# Altium PCB PCB1.PcbDoc
Units mil, origin at the board's own origin, x right, y up, seen from the top; angles counter-clockwise.
Board outline 4094.49 x 2755.91 mil, 4 copper layers (Top Layer, VCC, GND, Bottom Layer), stack 41 mil thick; 96 components, 180 nets, 688 pads, 0 vias.
Unrouted connection lines stored in the file: 475.
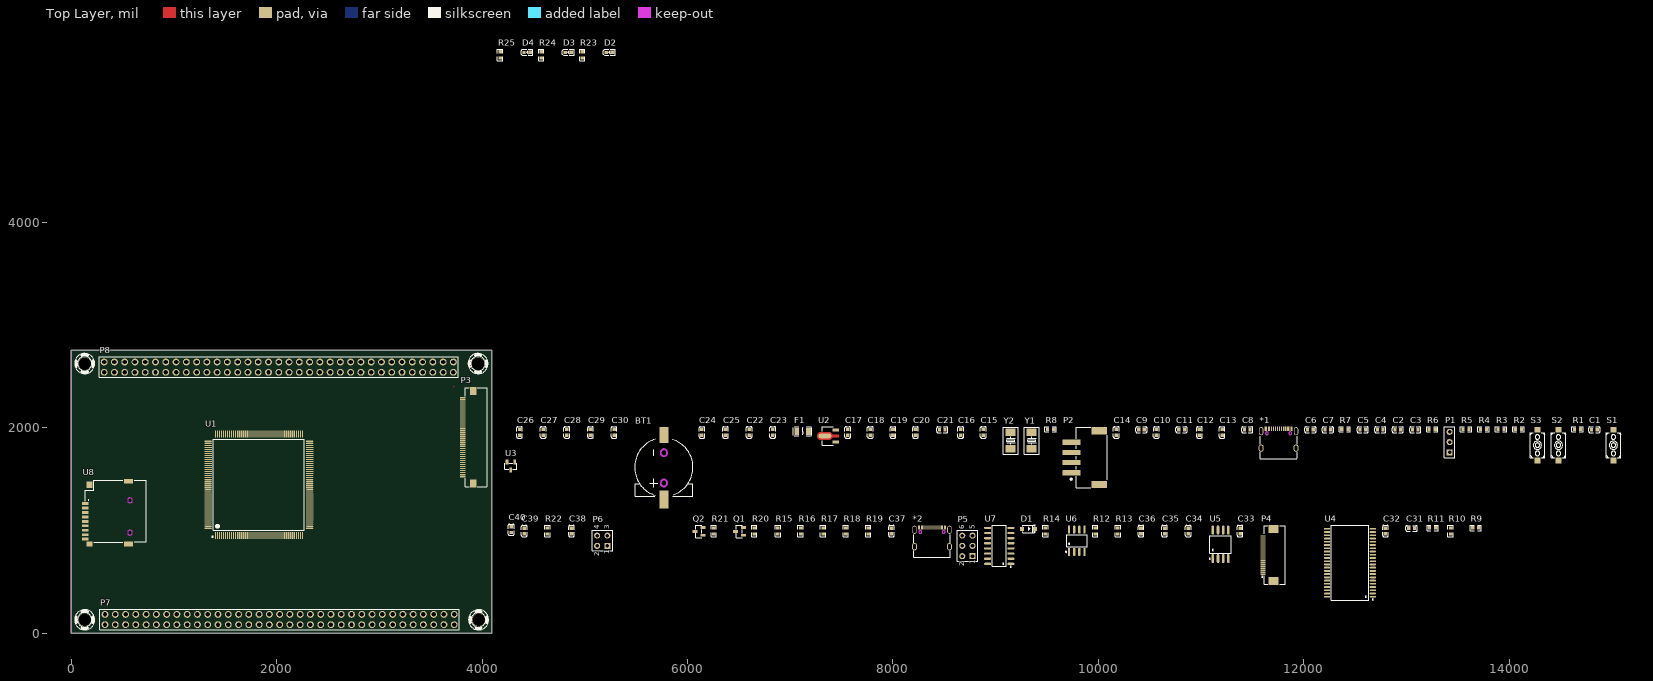
[diagram p0: Top Layer view]
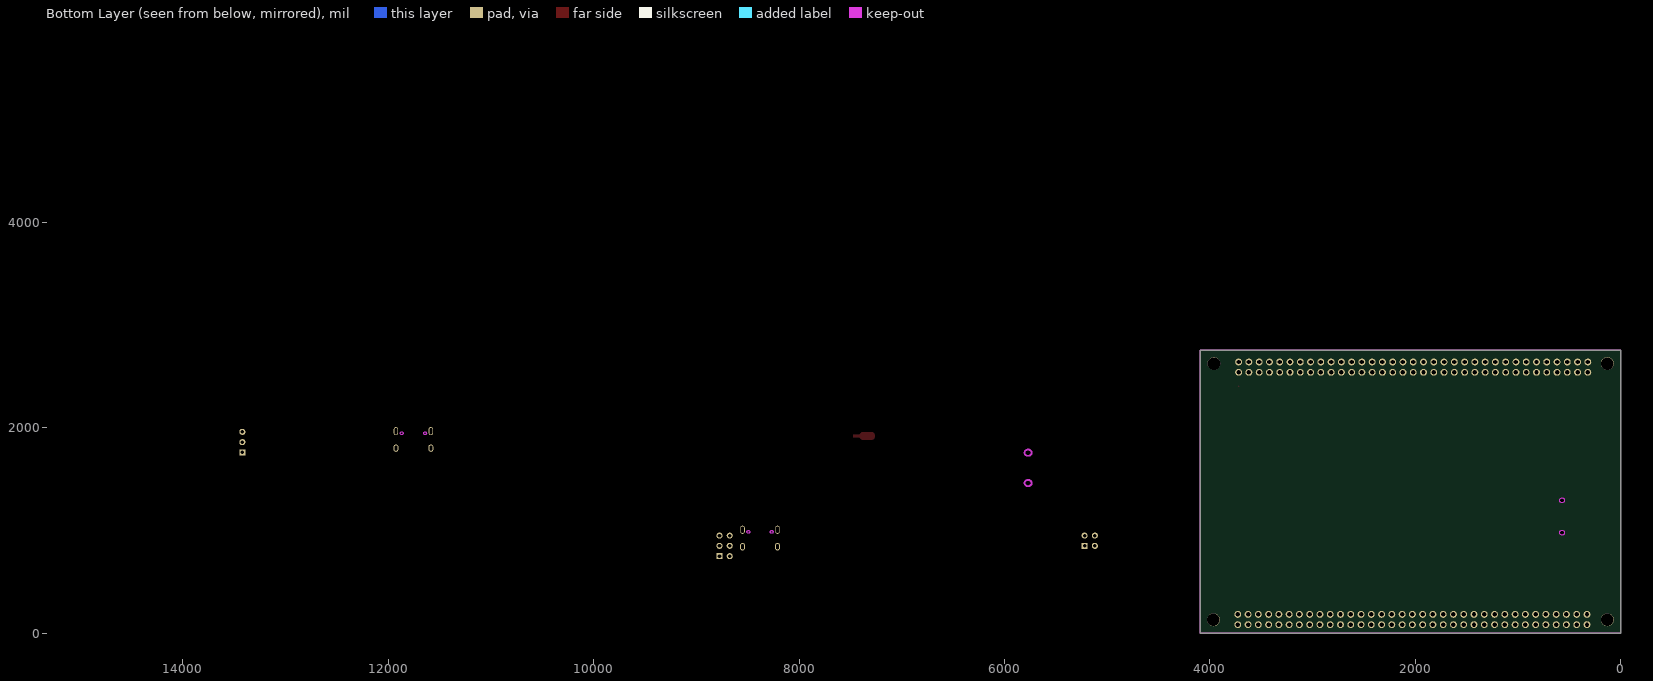
[diagram p1: Bottom Layer view, seen from below]
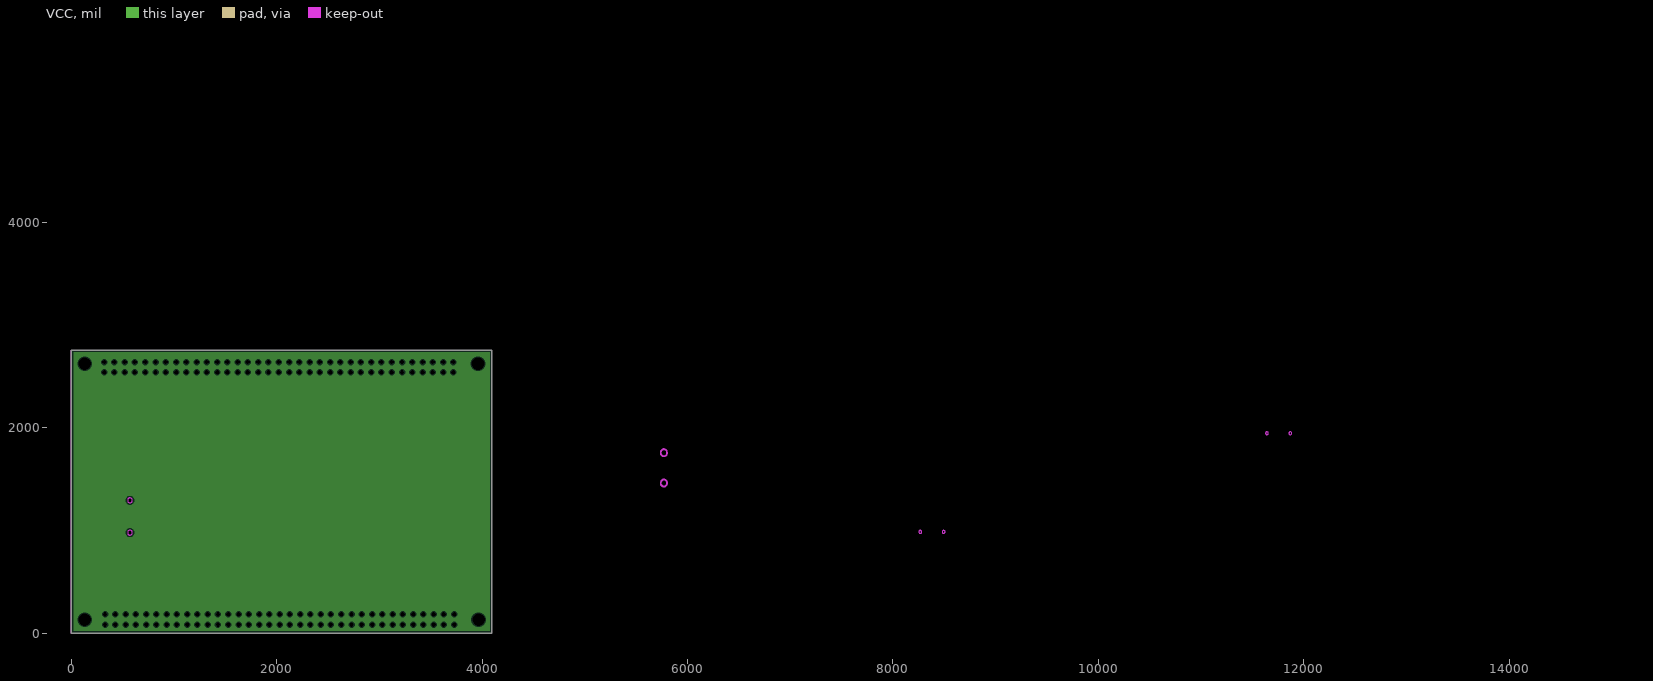
[diagram p2: VCC, clearances drawn from the general rule]
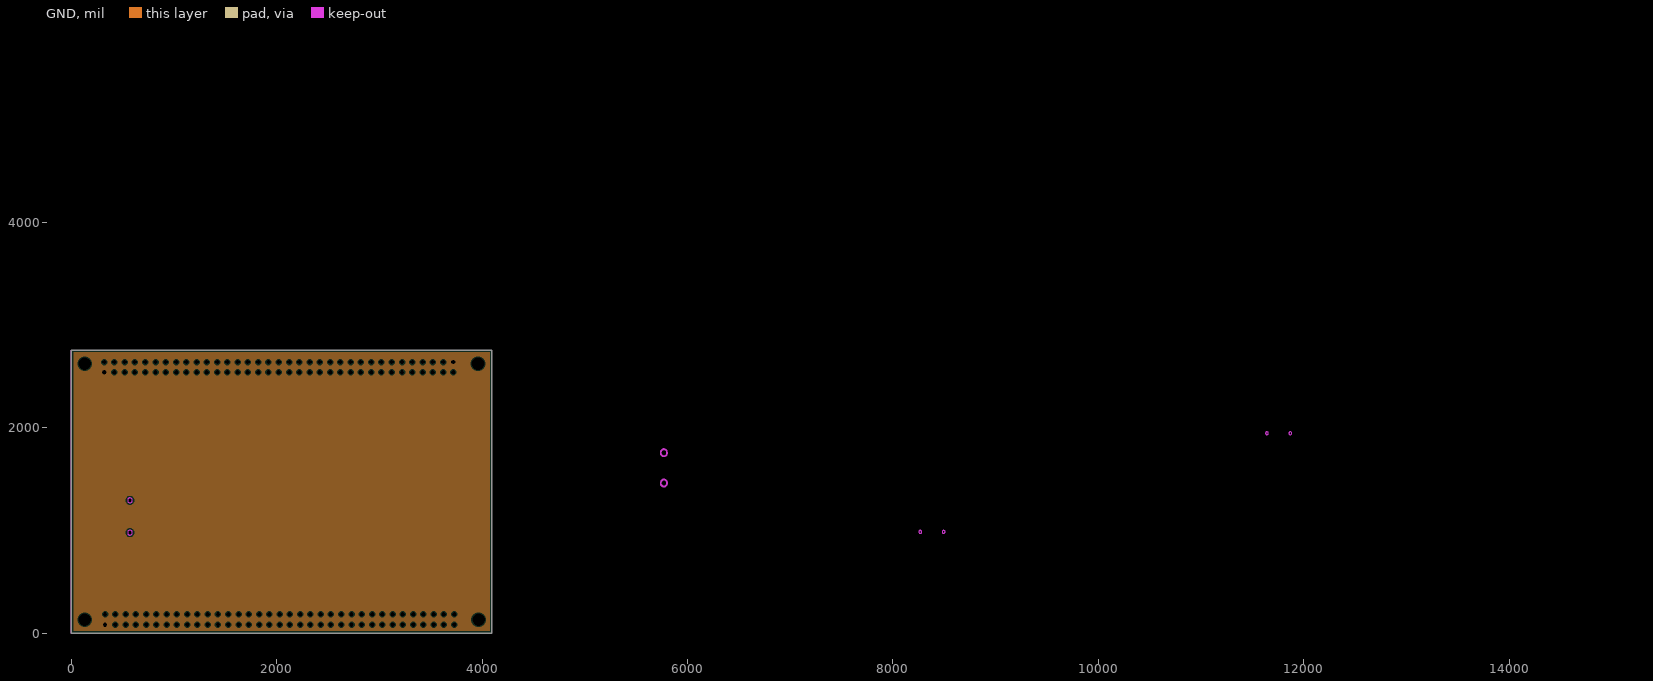
[diagram p3: GND, clearances drawn from the general rule]

## Layer stack, top to bottom
Top Solder: solder mask 0.4, Solder Resist, Dk 3.5
Top Layer: signal copper 1.4
Dielectric 2: prepreg 2.8, PP-006, Dk 4.1
VCC: plane copper 10, net VCC
Dielectric 1: dielectric 12.6, FR-4, Dk 4.8
GND: plane copper 10, net GND
Dielectric 3: prepreg 2.8, PP-006, Dk 4.1
Bottom Layer: signal copper 1.4
Bottom Solder: solder mask 0.4, Solder Resist, Dk 3.5

## Board outline
0,0 0,2755.91 4094.49,2755.91 4094.49,0

## Design rules (kind name [scope] priority, off if disabled: settings)
Clearance [All] p1: gap=10 ignorepadtopadclearanceinfootprint=TRUE except(5: Arc-Arc Arc-Track Arc-SMDPad Arc-THPad Arc-Via Arc-Text Track-Track Track-SMDPad Track-THPad Track-Via Track-Text SMDPad-SMDPad SMDPad-THPad SMDPad-Via SMDPad-Text THPad-THPad THPad-Via THPad-Text Via-Via Via-Text Fill-Text Poly-Text Region-Text Text-Text)
DiffPairsRouting [All] p1: maxlimit=10 minlimit=8 mostfreqgap=10 toplayer_minwidth=6.12 toplayer_maxwidth=15 toplayer_prefwidth=6.12 bottomlayer_minwidth=6.12 bottomlayer_maxwidth=15 bottomlayer_prefwidth=6.12 maxuncoupledlength=500
PlaneClearance [All] p1: clearance=10
PlaneConnect [All] p1: planeconnectstyle=Relief reliefexpansion=20 reliefentries=4 reliefconductorwidth=10 reliefairgap=10
PolygonConnect [All] p1: thpad.connectstyle=Relief thpad.reliefconductorwidth=10 thpad.reliefentries=4 thpad.polygonreliefangle="90 Angle" thpad.airgapwidth=10 smdpad.connectstyle=Relief smdpad.reliefconductorwidth=10 smdpad.reliefentries=4 smdpad.polygonreliefangle="45 Angle" smdpad.airgapwidth=10 via.connectstyle=Relief via.reliefconductorwidth=10 via.reliefentries=4 via.polygonreliefangle="90 Angle" via.airgapwidth=10
RoomDefinition Sheet3 [InComponentClass('Sheet3')] p1: confinementstyle=ConfineIn formatcopy=TRUE lockcomponents=FALSE outline 4140,2175 5825,2175 5825,5795 4140,5795
RoomDefinition Sheet2 [InComponentClass('Sheet2')] p2: confinementstyle=ConfineIn formatcopy=TRUE lockcomponents=FALSE outline 4140,1205 15100,1205 15100,2120 4140,2120
RoomDefinition Sheet1 [InComponentClass('Sheet1')] p3: confinementstyle=ConfineIn formatcopy=TRUE lockcomponents=FALSE outline 4140,60 13745,60 13745,1160 4140,1160
RoutingVias power_via [All] p1: holewidth=15 width=17 viastyle="Through Hole" minholewidth=28 minwidth=50 maxholewidth=28 maxwidth=50
RoutingVias general_via [All] p2: holewidth=12 width=16 viastyle="Through Hole" minholewidth=28 minwidth=50 maxholewidth=28 maxwidth=50
SolderMaskExpansion [All] p1: expansion=4 istentingtop=FALSE
Width POW [All] p1: maxlimit=10 minlimit=10 preferedwidth=10
Width SRAM_DAT [All] p2: maxlimit=5.5 minlimit=5.5 preferedwidth=5.5 minimp=50.000000 maximp=50.000000 favimp=50.000000
Width SRAM_ADD [All] p3: maxlimit=5.5 minlimit=5.5 preferedwidth=5.5 minimp=50.000000 maximp=50.000000 favimp=50.000000
27 further rules are at their usual default settings.

## Classes and differential pairs
component class Sheet3: D2 D3 D4 P7 P8 R23 R24 R25
component class Sheet2: *1 BT1 C1 C2 C3 C4 C5 C6 C7 C8 C9 C10 C11 C12 C13 C14 C15 C16 C17 C18 C19 C20 C21 C22 C23 C24 C25 C26 C27 C28 C29 C30 F1 P1 P2 R1 R2 R3 R4 R5 R6 R7 R8 S1 S2 S3 U1 U2 U3 Y1 Y2
component class Sheet1: *2 C31 C32 C33 C34 C35 C36 C37 C38 C39 C40 D1 P3 P4 P5 P6 Q1 Q2 R9 R10 R11 R12 R13 R14 R15 R16 R17 R18 R19 R20 R21 R22 U4 U5 U6 U7 U8
differential pair USB340: +USB340_P -USB340_N
differential pair USB1OTG: +USB1OTG_P -USB1OTG_N

## Components (designator, comment, footprint, x,y, rotation, side; value= is the part's Value field where it differs from the comment)
*1 "TYPE-C" USB-C-SMD_TYPE-C-6PIN-2MD-073 11755,1895 r0 top
*2 "TYPE-C" USB-C-SMD_TYPE-C-6PIN-2MD-073 8380,935 r0 top
BT1 "Battery" BAT-SMD_CR1220-2 5770,1615 r90 top
C1 "100nF" C0603 14830,1980 r0 top value=100pF
C2 "100nF" C0603 12915,1980 r0 top value=100pF
C3 "10uF" C0603 13085,1980 r0 top value=100pF
C4 "2.2uF" C0603 12745,1980 r0 top value=100pF
C5 "2.2uF" C0603 12575,1980 r0 top value=100pF
C6 "100nF" C0603 12065,1980 r0 top value=100pF
C7 "10uF" C0603 12235,1980 r0 top value=100pF
C8 "20pF" C0603 11450,1980 r0 top value=100pF
C9 "100nF" C0603 10420,1980 r0 top value=100pF
C10 "100nF" C0603 10565,1955 r90 top value=100pF
C11 "100nF" C0603 10810,1980 r0 top value=100pF
C12 "100nF" C0603 10985,1955 r90 top value=100pF
C13 "100nF" C0603 11205,1955 r90 top value=100pF
C14 "20pF" C0603 10175,1955 r90 top value=100pF
C15 "20pF" C0603 8880,1955 r90 top value=100pF
C16 "20pF" C0603 8660,1955 r90 top value=100pF
C17 "100nF" C0603 7560,1955 r90 top value=100pF
C18 "100nF" C0603 7780,1955 r90 top value=100pF
C19 "100nF" C0603 8000,1955 r90 top value=100pF
C20 "100nF" C0603 8220,1955 r90 top value=100pF
C21 "100nF" C0603 8480,1980 r0 top value=100pF
C22 "100nF" C0603 6600,1955 r90 top value=100pF
C23 "10uF" C0603 6830,1955 r90 top value=100pF
C24 "100nF" C0603 6140,1955 r90 top value=100pF
C25 "10uF" C0603 6370,1955 r90 top value=100pF
C26 "100nF" C0603 4365,1955 r90 top value=100pF
C27 "100nF" C0603 4595,1955 r90 top value=100pF
C28 "100nF" C0603 4825,1955 r90 top value=100pF
C29 "100nF" C0603 5055,1955 r90 top value=100pF
C30 "100nF" C0603 5285,1955 r90 top value=100pF
C31 "10uF" C0603 13050,1020 r0 top value=100pF
C32 "10uF" C0603 12795,995 r90 top value=100pF
C33 "100nF" C0603 11380,995 r90 top value=100pF
C34 "100nF" C0603 10875,995 r90 top value=100pF
C35 "100nF" C0603 10645,995 r90 top value=100pF
C36 "100nF" C0603 10415,995 r90 top value=100pF
C37 "100nF" C0603 7985,995 r90 top value=100pF
C38 "100nF" C0603 4870,995 r90 top value=100pF
C39 "100nF" C0603 4410,995 r90 top value=100pF
C40 "100nF" C0603 4283.46,1007.88 r90 top value=100pF
D1 "1N4148" SOD-123_L2.7-W1.6-LS3.7-FD 9320,1015 r0 top
D2 "LED0" LED0603-RD_RED 5240,5655 r0 top
D3 "LED0" LED0603-RD_RED 4840,5655 r0 top
D4 "LED0" LED0603-RD_RED 4440,5655 r0 top
F1 "smd1206-100-30" F1206 7120,1965 r0 top
P1 "Header 3" HDR1X3 13420,1760 r90 top
P2 "Header 4" CONN-SMD_HCZZ0021-4 9875,1710 r90 top
P3 "LCD_SCREEN" FPC-SMD_P0.50-40P_FGS-XJ-H2.0 3862.2,1907.48 r270 top
P4 "OV5460" FPC-SMD_20P-P0.50_XUNPU_FPC-05F-20PH20 11655,760 r90 top
P5 "Header 3X2" HDR2X3 8775,750 r90 top
P6 "Header 2X2" HDR2X2 5220,850 r90 top
P7 "TEXT_PIN" TEST_P70 3728.35,182.68 r180 top
P8 "TEXT_PIN" TEST_P70 3720,2640 r180 top
Q1 "SS8050" SOT-23-3_L2.9-W1.3-P1.90-LS2.4-BR 6505,990 r0 top
Q2 "SS8550" SOT-23-3_L2.9-W1.3-P1.90-LS2.4-BR 6110,990 r0 top
R1 "10K" R0603 14665,1985 r0 top value=1K
R2 "0" R0603 14090,1985 r0 top value=1K
R3 "0" R0603 13920,1985 r0 top value=1K
R4 "0" R0603 13750,1985 r0 top value=1K
R5 "0" R0603 13580,1985 r0 top value=1K
R6 "10R" R0603 13250,1985 r0 top value=1K
R7 "10R" R0603 12400,1985 r0 top value=1K
R8 "10K" R0603 9535,1985 r0 top value=1K
R9 "10K" R0603 13675,1025 r0 top value=1K
R10 "2.2R" R0603 13430,995 r90 top value=1K
R11 "2.2R" R0603 13255,1025 r0 top value=1K
R12 "10K" R0603 9970,995 r90 top value=1K
R13 "10K" R0603 10190,995 r90 top value=1K
R14 "10K" R0603 9485,995 r90 top value=1K
R15 "10K" R0603 6880,995 r90 top value=1K
R16 "10K" R0603 7100,995 r90 top value=1K
R17 "10K" R0603 7320,995 r90 top value=1K
R18 "10K" R0603 7540,995 r90 top value=1K
R19 "10K" R0603 7760,995 r90 top value=1K
R20 "1K" R0603 6650,995 r90 top
R21 "1K" R0603 6255,995 r90 top
R22 "1K" R0603 4635,995 r90 top
R23 "1K" R0603 4975,5630 r90 top
R24 "1K" R0603 4575,5630 r90 top
R25 "1K" R0603 4175,5630 r90 top
S1 "SW-PB" KEY-SMD_L6.2-W3.6-LS8.0 15015,1830 r90 top
S2 "SW-PB" KEY-SMD_L6.2-W3.6-LS8.0 14480,1830 r90 top
S3 "SW-PB" KEY-SMD_L6.2-W3.6-LS8.0 14275,1830 r90 top
U1 "STM32F407IGT6" LQFP-176_L24.0-W24.0-P0.50-BL 1826.77,1444.88 r0 top
U2 "AMS1117" SOT-89-3_L4.5-W2.5-P1.50-LS4.2-BR 7390,1920 r0 top
U3 "bat54c_c22466350" SOT-23-3_L2.9-W1.3-P1.90-LS2.4-BR 4279.53,1625.98 r90 top
U4 "is61lv25616al-10tli-tr" TSOP-44_L18.4-W10.2-P0.80-LS11.8-BL 12450,685 r90 top
U5 "W25Q128" SOIC-8_L5.3-W5.3-P1.27-LS8.0-BL 11190,865 r0 top
U6 "24C20" SOP-8_L5.0-W4.0-P1.27-LS6.0-BL 9790,900 r0 top
U7 "CH340C" SOP-16_L10.0-W3.9-P1.27-LS6.0-BL 9035,850 r90 top
U8 "TF0CARD H1.8" TF-SMD_TF-PUSH 346.46,1173.23 r90 top
Y1 "10MHZ" CRYSTAL-SMD_L5.0-W3.2 9350,1875 r90 top
Y2 "32.768KHZ" CRYSTAL-SMD_L5.0-W3.2 9145,1875 r90 top

## Footprints (in the part's own frame and the unit in brackets; to place one, negate y for a bottom-side part, rotate by r counter-clockwise, add the part's x,y. Pads: shape width x height; smd on the part's side, far side on the other; paste and mask are expansions set on the pad)
BAT-SMD_CR1220-2 [mm]
  rect 4.4x2.3 smd paste+0 mask+0.05: 1(-8,0)
  rect 4x2.3 smd paste+0 mask+0.05: 2(8,0)
  Keep-Out Layer board cut-out: 4.35,0 4.247,0.371 3.972,0.642 3.6,0.741 3.227,0.642 2.953,0.371 2.85,0 2.85,0 2.953,-0.371 3.228,-0.642 3.6,-0.741 3.972,-0.642 4.247,-0.371 4.35,0
  Keep-Out Layer board cut-out: -3.15,0 -3.253,0.371 -3.527,0.642 -3.9,0.741 -4.272,0.642 -4.546,0.371 -4.65,0 -4.65,0 -4.546,-0.371 -4.272,-0.642 -3.9,-0.741 -3.527,-0.642 -3.253,-0.371 -3.15,0
  Keep-Out Layer circle w0.1: c-3.9,0 r0.926
  Keep-Out Layer circle w0.1: c3.6,0 r0.933
  Multi-Layer keep-out circle w0.254: c3.6,0 r0.75
  Multi-Layer keep-out circle w0.254: c-3.9,0 r0.75
  silkscreen extent -7.22,-7.19 6.92,7.25
C0603 [mm]
  rect 0.8x0.9 smd: 1(-0.7,0) 2(0.7,0)
  silkscreen extent -1.41,-0.71 1.39,0.72
CONN-SMD_HCZZ0021-4 [mm]
  rect 1.3x4.4 smd: 1(-3.75,3.438) 2(-1.25,3.438) 3(1.25,3.438) 4(3.75,3.438)
  rect 1.8x3.85 smd: 5(-6.65,-3.438) 6(6.65,-3.438)
  silkscreen extent -7.5,-5.35 7.5,3.75
CRYSTAL-SMD_L5.0-W3.2 [mm]
  rect 1.9x2.4 smd: 1(-2.05,0) 2(2.05,0)
  silkscreen extent -3.32,-1.85 3.33,1.85
F1206 [mm]
  rect 1.19x1.728 smd: 1(-1.445,0) 2(1.445,0)
  silkscreen extent -2.27,-1.09 2.27,1.09
FPC-SMD_20P-P0.50_XUNPU_FPC-05F-20PH20 [mm]
  rect 0.3x1.25 smd paste+0 mask+0.05: 1(-4.75,1.288) 2(-4.25,1.288) 3(-3.75,1.288) 4(-3.25,1.288) 5(-2.75,1.288) 6(-2.25,1.288) 7(-1.75,1.288) 8(-1.25,1.288) 9(-0.75,1.288) 10(-0.25,1.288) 11(0.25,1.288) 12(0.75,1.288) 13(1.25,1.288) 14(1.75,1.288) 15(2.25,1.288) 16(2.75,1.288) 17(3.25,1.288) 18(3.75,1.288) 19(4.25,1.288) 20(4.75,1.288)
  rect 2x2.5 smd paste+0 mask+0.05: 21(6.44,-1.287) 22(-6.44,-1.287)
  silkscreen extent -7.2,-4.19 7.2,1.67
FPC-SMD_P0.50-40P_FGS-XJ-H2.0 [mm]
  rect 2x1.6 smd: 0(-11.45,1.3) 0(11.45,1.3)
  rect 0.3x1.3 smd paste+0 mask+0.05: 1(9.75,-1.3) 2(9.25,-1.3) 3(8.75,-1.3) 4(8.25,-1.3) 5(7.75,-1.3) 6(7.25,-1.3) 7(6.75,-1.3) 8(6.25,-1.3) 9(5.75,-1.3) 10(5.25,-1.3) 11(4.75,-1.3) 12(4.25,-1.3) 13(3.75,-1.3) 14(3.25,-1.3) 15(2.75,-1.3) 16(2.25,-1.3) 17(1.75,-1.3) 18(1.25,-1.3) 19(0.75,-1.3) 20(0.25,-1.3) 21(-0.25,-1.3) 22(-0.75,-1.3) 23(-1.25,-1.3) 24(-1.75,-1.3) 25(-2.25,-1.3) 26(-2.75,-1.3) 27(-3.25,-1.3) 28(-3.75,-1.3) 29(-4.25,-1.3) 30(-4.75,-1.3) 31(-5.25,-1.3) 32(-5.75,-1.3) 33(-6.25,-1.3) 34(-6.75,-1.3) 35(-7.25,-1.3) 36(-7.75,-1.3) 37(-8.25,-1.3) 38(-8.75,-1.3) 39(-9.25,-1.3) 40(-9.75,-1.3)
  silkscreen extent -12.2,-0.7 12.25,4.7
HDR1X3 [mm] "Connector; Header; 3 Position"
  rect 1.5x1.5 hole 0.9: 1(0,0)
  round 1.5 hole 0.9: 2(2.54,0) 3(5.08,0)
  silkscreen extent -1.27,-1.27 6.35,1.27
HDR2X2 [mm] "Connector; Header; 2x2 Position"
  rect 1.5x1.5 hole 0.9: 1(0,0)
  round 1.5 hole 0.9: 2(0,2.54) 3(2.54,0) 4(2.54,2.54)
  silkscreen extent -1.27,-1.27 3.81,3.81
HDR2X3 [mm] "Connector; Header; 3x2 Position"
  rect 1.5x1.5 hole 0.9: 1(0,0)
  round 1.5 hole 0.9: 2(0,2.54) 3(2.54,0) 4(2.54,2.54) 5(5.08,0) 6(5.08,2.54)
  silkscreen extent -1.27,-1.27 6.35,3.81
KEY-SMD_L6.2-W3.6-LS8.0 [mm]
  rect 1.4x1.5 smd: 1(-3.8,0) 2(3.8,0)
  silkscreen extent -3.1,-1.8 3.1,1.8
LED0603-RD_RED [mm]
  rect 0.8x0.8 smd: 1(0.8,0.003) 2(-0.8,-0.003)
  silkscreen extent -1.49,-0.75 1.39,0.76
LQFP-176_L24.0-W24.0-P0.50-BL [mm]
  oval 0.28x1.8 smd: 1(-10.75,-12.55) 2(-10.25,-12.55) 3(-9.75,-12.55) 4(-9.25,-12.55) 5(-8.75,-12.55) 6(-8.25,-12.55) 7(-7.75,-12.55) 8(-7.25,-12.55) 9(-6.75,-12.55) 10(-6.25,-12.55) 11(-5.75,-12.55) 12(-5.25,-12.55) 13(-4.75,-12.55) 14(-4.25,-12.55) 15(-3.75,-12.55) 16(-3.25,-12.55) 17(-2.75,-12.55) 18(-2.25,-12.55) 19(-1.75,-12.55) 20(-1.25,-12.55) 21(-0.75,-12.55) 22(-0.25,-12.55) 23(0.25,-12.55) 24(0.75,-12.55) 25(1.25,-12.55) 26(1.75,-12.55) 27(2.25,-12.55) 28(2.75,-12.55) 29(3.25,-12.55) 30(3.75,-12.55) 31(4.25,-12.55) 32(4.75,-12.55) 33(5.25,-12.55) 34(5.75,-12.55) 35(6.25,-12.55) 36(6.75,-12.55) 37(7.25,-12.55) 38(7.75,-12.55) 39(8.25,-12.55) 40(8.75,-12.55) 41(9.25,-12.55) 42(9.75,-12.55) 43(10.25,-12.55) 44(10.75,-12.55) 89(10.75,12.55) 90(10.25,12.55) 91(9.75,12.55) 92(9.25,12.55) 93(8.75,12.55) 94(8.25,12.55) 95(7.75,12.55) 96(7.25,12.55) 97(6.75,12.55) 98(6.25,12.55) 99(5.75,12.55) 100(5.25,12.55) 101(4.75,12.55) 102(4.25,12.55) 103(3.75,12.55) 104(3.25,12.55) 105(2.75,12.55) 106(2.25,12.55) 107(1.75,12.55) 108(1.25,12.55) 109(0.75,12.55) 110(0.25,12.55) 111(-0.25,12.55) 112(-0.75,12.55) 113(-1.25,12.55) 114(-1.75,12.55) 115(-2.25,12.55) 116(-2.75,12.55) 117(-3.25,12.55) 118(-3.75,12.55) 119(-4.25,12.55) 120(-4.75,12.55) 121(-5.25,12.55) 122(-5.75,12.55) 123(-6.25,12.55) 124(-6.75,12.55) 125(-7.25,12.55) 126(-7.75,12.55) 127(-8.25,12.55) 128(-8.75,12.55) 129(-9.25,12.55) 130(-9.75,12.55) 131(-10.25,12.55) 132(-10.75,12.55)
  oval 1.8x0.28 smd: 45(12.55,-10.75) 46(12.55,-10.25) 47(12.55,-9.75) 48(12.55,-9.25) 49(12.55,-8.75) 50(12.55,-8.25) 51(12.55,-7.75) 52(12.55,-7.25) 53(12.55,-6.75) 54(12.55,-6.25) 55(12.55,-5.75) 56(12.55,-5.25) 57(12.55,-4.75) 58(12.55,-4.25) 59(12.55,-3.75) 60(12.55,-3.25) 61(12.55,-2.75) 62(12.55,-2.25) 63(12.55,-1.75) 64(12.55,-1.25) 65(12.55,-0.75) 66(12.55,-0.25) 67(12.55,0.25) 68(12.55,0.75) 69(12.55,1.25) 70(12.55,1.75) 71(12.55,2.25) 72(12.55,2.75) 73(12.55,3.25) 74(12.55,3.75) 75(12.55,4.25) 76(12.55,4.75) 77(12.55,5.25) 78(12.55,5.75) 79(12.55,6.25) 80(12.55,6.75) 81(12.55,7.25) 82(12.55,7.75) 83(12.55,8.25) 84(12.55,8.75) 85(12.55,9.25) 86(12.55,9.75) 87(12.55,10.25) 88(12.55,10.75) 133(-12.55,10.75) 134(-12.55,10.25) 135(-12.55,9.75) 136(-12.55,9.25) 137(-12.55,8.75) 138(-12.55,8.25) 139(-12.55,7.75) 140(-12.55,7.25) 141(-12.55,6.75) 142(-12.55,6.25) 143(-12.55,5.75) 144(-12.55,5.25) 145(-12.55,4.75) 146(-12.55,4.25) 147(-12.55,3.75) 148(-12.55,3.25) 149(-12.55,2.75) 150(-12.55,2.25) 151(-12.55,1.75) 152(-12.55,1.25) 153(-12.55,0.75) 154(-12.55,0.25) 155(-12.55,-0.25) 156(-12.55,-0.75) 157(-12.55,-1.25) 158(-12.55,-1.75) 159(-12.55,-2.25) 160(-12.55,-2.75) 161(-12.55,-3.25) 162(-12.55,-3.75) 163(-12.55,-4.25) 164(-12.55,-4.75) 165(-12.55,-5.25) 166(-12.55,-5.75) 167(-12.55,-6.25) 168(-12.55,-6.75) 169(-12.55,-7.25) 170(-12.55,-7.75) 171(-12.55,-8.25) 172(-12.55,-8.75) 173(-12.55,-9.25) 174(-12.55,-9.75) 175(-12.55,-10.25) 176(-12.55,-10.75)
  silkscreen extent -11.63,-13 11.25,11.25
R0603 [mil]
  rect 31.75x34.02 smd paste-3937.01 mask+2: 1(-29.66,0) 2(29.66,0)
  silkscreen extent -55,-26 55,26
SOD-123_L2.7-W1.6-LS3.7-FD [mm]
  rect 0.88x0.96 smd: 1(-1.61,0) 2(1.61,0)
  silkscreen extent -1.38,-1 1.6,1
SOIC-8_L5.3-W5.3-P1.27-LS8.0-BL [mm]
  oval 0.63x2.25 smd: 1(-1.905,-3.53) 2(-0.635,-3.53) 3(0.635,-3.53) 4(1.905,-3.53) 5(1.905,3.53) 6(0.635,3.53) 7(-0.635,3.53) 8(-1.905,3.53)
  silkscreen extent -2.82,-3.68 2.64,2.18
SOP-8_L5.0-W4.0-P1.27-LS6.0-BL [mil]
  oval 22.6x80.14 smd: 1(-75,-108.97) 2(-25,-108.97) 3(25,-108.97) 4(75,-108.97) 5(75,108.97) 6(25,108.97) 7(-25,108.97) 8(-75,108.97)
  silkscreen extent -110,-115 99,60
SOP-16_L10.0-W3.9-P1.27-LS6.0-BL [mm]
  oval 0.56x1.745 smd: 1(-4.445,-2.872) 2(-3.175,-2.872) 3(-1.905,-2.872) 4(-0.635,-2.872) 5(0.635,-2.872) 6(1.905,-2.872) 7(3.175,-2.872) 8(4.445,-2.872) 9(4.445,2.872) 10(3.175,2.872) 11(1.905,2.872) 12(0.635,2.872) 13(-0.635,2.872) 14(-1.905,2.872) 15(-3.175,2.872) 16(-4.445,2.872)
  silkscreen extent -5.33,-3.02 5.08,1.77
SOT-23-3_L2.9-W1.3-P1.90-LS2.4-BR [mm]
  rect 1.25x0.7 smd: 1(1,-0.95) 2(1,0.95) 3(-1,0)
  silkscreen extent -0.73,-1.53 0.73,1.53
SOT-89-3_L4.5-W2.5-P1.50-LS4.2-BR [mm]
  rect 1.575x0.672 smd: 1(1.356,-1.5) 3(1.356,1.5)
  oval 3.226x1.14 smd: 2(-1.356,0)
  Top Layer region: -2.283,0.95 -0.429,0.95 -0.384,0.949 -0.34,0.946 -0.296,0.94 -0.252,0.933 -0.208,0.924 -0.165,0.912 -0.123,0.899 -0.081,0.884 -0.04,0.866 0,0.847 0.04,0.826 0.078,0.803 0.115,0.779 0.151,0.752 0.185,0.724 0.219,0.695 0.251,0.664 0.281,0.631 0.31,0.597 0.337,0.562 0.362,0.525 0.386,0.488 0.408,0.449 0.428,0.409 0.447,0.33 2.144,0.33 2.144,-0.33 0.447,-0.33 0.428,-0.409 0.408,-0.449 0.386,-0.488 0.362,-0.526 0.337,-0.562 0.31,-0.597 0.281,-0.631 0.251,-0.664 0.219,-0.695 0.185,-0.725 0.151,-0.753 0.115,-0.779 0.078,-0.804 0.04,-0.827 0,-0.848 -0.04,-0.867 -0.081,-0.884 -0.123,-0.899 -0.165,-0.913 -0.208,-0.924 -0.252,-0.934 -0.296,-0.941 -0.34,-0.946 -0.384,-0.949 -0.429,-0.95 -2.283,-0.95 -2.328,-0.949 -2.372,-0.946 -2.416,-0.941 -2.46,-0.934 -2.504,-0.924 -2.547,-0.913 -2.589,-0.899 -2.631,-0.884 -2.672,-0.867 -2.713,-0.848 -2.752,-0.827 -2.79,-0.804 -2.827,-0.779 -2.863,-0.753 -2.898,-0.725 -2.931,-0.695 -2.963,-0.664 -2.993,-0.631 -3.022,-0.597 -3.049,-0.562 -3.075,-0.526 -3.098,-0.488 -3.12,-0.449 -3.141,-0.409 -3.159,-0.369 -3.175,-0.327 -3.189,-0.285 -3.202,-0.242 -3.212,-0.199 -3.22,-0.155 -3.227,-0.111 -3.231,-0.067 -3.233,-0.022 -3.233,0.022 -3.231,0.067 -3.227,0.111 -3.22,0.155 -3.212,0.199 -3.202,0.242 -3.189,0.285 -3.175,0.327 -3.159,0.369 -3.141,0.409 -3.12,0.449 -3.098,0.488 -3.075,0.525 -3.049,0.562 -3.022,0.597 -2.993,0.631 -2.963,0.664 -2.931,0.695 -2.898,0.724 -2.863,0.752 -2.827,0.779 -2.79,0.803 -2.752,0.826 -2.713,0.847 -2.672,0.866 -2.631,0.884 -2.589,0.899 -2.547,0.912 -2.504,0.924 -2.46,0.933 -2.416,0.94 -2.372,0.946 -2.328,0.949 -2.283,0.95
  silkscreen extent -1.95,-2.33 0.7,2.33
TEST_P70 [mm]
  round 1.7 hole 1.1 mask+0.014: 1(0,0) 2(0,2.54) 3(2.54,0) 4(2.54,2.54) 5(5.08,0) 6(5.08,2.54) 7(7.62,0) 8(7.62,2.54) 9(10.16,0) 10(10.16,2.54) 11(12.7,0) 12(12.7,2.54) 13(15.24,0) 14(15.24,2.54) 15(17.78,0) 16(17.78,2.54) 17(20.32,0) 18(20.32,2.54) 19(22.86,0) 20(22.86,2.54) 21(25.4,0) 22(25.4,2.54) 23(27.94,0) 24(27.94,2.54) 25(30.48,0) 26(30.48,2.54) 27(33.02,0) 28(33.02,2.54) 29(35.56,0) 30(35.56,2.54) 31(38.1,0) 32(38.1,2.54) 33(40.64,0) 34(40.64,2.54) 35(43.18,0) 36(43.18,2.54) 37(45.72,0) 38(45.72,2.54) 39(48.26,0) 40(48.26,2.54) 41(50.8,0) 42(50.8,2.54) 43(53.34,0) 44(53.34,2.54) 45(55.88,0) 46(55.88,2.54) 47(58.42,0) 48(58.42,2.54) 49(60.96,0) 50(60.96,2.54) 51(63.5,0) 52(63.5,2.54) 53(66.04,0) 54(66.04,2.54) 55(68.58,0) 56(68.58,2.54) 57(71.12,0) 58(71.12,2.54) 59(73.66,0) 60(73.66,2.54) 61(76.2,0) 62(76.2,2.54) 63(78.74,0) 64(78.74,2.54) 65(81.28,0) 66(81.28,2.54) 67(83.82,0) 68(83.82,2.54) 69(86.36,0) 70(86.36,2.54)
  silkscreen extent -1.27,-1.27 87.63,3.81
TF-SMD_TF-PUSH [mm]
  rect 0.7x1.6 smd: 1(2.25,5.3) 2(1.15,5.3) 3(0.05,5.3) 4(-1.05,5.3) 5(-2.15,5.3) 6(-3.25,5.3) 7(-4.35,5.3) 8(-5.45,5.3) CD(-6.55,5.3)
  rect 1.2x1.5 smd: 10(-7.75,4.3)
  rect 1.2x2.2 smd: 11(-7.75,-5.3) 12(7.75,-5.3)
  rect 1.6x1.5 smd: 13(6.85,4.3)
  Keep-Out Layer board cut-out: -4.35,-5.7 -4.35,-5.581 -4.441,-5.36 -4.61,-5.191 -4.831,-5.1 -5.069,-5.1 -5.29,-5.191 -5.459,-5.36 -5.55,-5.581 -5.55,-5.7 -5.55,-5.819 -5.459,-6.04 -5.29,-6.209 -5.069,-6.3 -4.831,-6.3 -4.61,-6.209 -4.441,-6.04 -4.35,-5.819 -4.35,-5.7 -4.35,-5.7
  Keep-Out Layer board cut-out: 3.65,-5.7 3.65,-5.581 3.559,-5.36 3.39,-5.191 3.169,-5.1 2.931,-5.1 2.71,-5.191 2.541,-5.36 2.45,-5.581 2.45,-5.7 2.45,-5.819 2.541,-6.04 2.71,-6.209 2.931,-6.3 3.169,-6.3 3.39,-6.209 3.559,-6.04 3.65,-5.819 3.65,-5.7 3.65,-5.7
  Keep-Out Layer circle w0.1: c3.05,-5.7 r0.6
  Keep-Out Layer circle w0.1: c-4.95,-5.7 r0.6
  Multi-Layer keep-out circle w0.254: c-4.95,-5.7 r0.6
  Multi-Layer keep-out circle w0.254: c3.05,-5.7 r0.6
  silkscreen extent -7.26,-9.7 8,5.3
TSOP-44_L18.4-W10.2-P0.80-LS11.8-BL [mm]
  oval 0.448x1.551 smd: 1(-8.4,-5.656) 2(-7.6,-5.656) 3(-6.8,-5.656) 4(-6,-5.656) 5(-5.2,-5.656) 6(-4.4,-5.656) 7(-3.6,-5.656) 8(-2.8,-5.656) 9(-2,-5.656) 10(-1.2,-5.656) 11(-0.4,-5.656) 12(0.4,-5.656) 13(1.2,-5.656) 14(2,-5.656) 15(2.8,-5.656) 16(3.6,-5.656) 17(4.4,-5.656) 18(5.2,-5.656) 19(6,-5.656) 20(6.8,-5.656) 21(7.6,-5.656) 22(8.4,-5.656) 23(8.4,5.656) 24(7.6,5.656) 25(6.8,5.656) 26(6,5.656) 27(5.2,5.656) 28(4.4,5.656) 29(3.6,5.656) 30(2.8,5.656) 31(2,5.656) 32(1.2,5.656) 33(0.4,5.656) 34(-0.4,5.656) 35(-1.2,5.656) 36(-2,5.656) 37(-2.8,5.656) 38(-3.6,5.656) 39(-4.4,5.656) 40(-5.2,5.656) 41(-6,5.656) 42(-6.8,5.656) 43(-7.6,5.656) 44(-8.4,5.656)
  silkscreen extent -9.28,-5.81 9.28,4.65
USB-C-SMD_TYPE-C-6PIN-2MD-073 [mm]
  rect 0.55x1.1 smd paste-100 mask+0.05: 1(-3.2,2.375) 2(-2.4,2.375) 11(2.4,2.375) 12(3.2,2.375)
  rect 0.3x1.1 smd paste-100 mask+0.05: 3(-1.75,2.375) 4(-1.25,2.375) 5(-0.75,2.375) 6(-0.25,2.375) 7(0.25,2.375) 8(0.75,2.375) 9(1.25,2.375) 10(1.75,2.375)
  oval 1.1x2 hole 0.6 slot 1.5 at 90 deg paste+0 mask+0.05: 13(-4.325,1.825) 14(4.325,1.825)
  oval 1.2x1.8 hole 0.6 slot 1.2 at 90 deg paste+0 mask+0.05: 13(-4.325,-2.375) 14(4.325,-2.375)
  Keep-Out Layer board cut-out: -2.54,1.305 -2.541,1.374 -2.595,1.5 -2.694,1.597 -2.821,1.649 -2.959,1.649 -3.086,1.597 -3.184,1.5 -3.239,1.374 -3.24,1.305 -3.239,1.236 -3.184,1.11 -3.086,1.013 -2.959,0.961 -2.821,0.961 -2.694,1.013 -2.595,1.11 -2.541,1.236 -2.54,1.305 -2.54,1.305
  Keep-Out Layer board cut-out: 3.24,1.305 3.239,1.374 3.185,1.5 3.086,1.597 2.959,1.649 2.821,1.649 2.694,1.597 2.596,1.5 2.541,1.374 2.54,1.305 2.541,1.236 2.596,1.11 2.694,1.013 2.821,0.961 2.959,0.961 3.086,1.013 3.185,1.11 3.239,1.236 3.24,1.305 3.24,1.305
  Keep-Out Layer circle w0.1: c-2.89,1.305 r0.353
  Keep-Out Layer circle w0.1: c2.89,1.305 r0.353
  Multi-Layer keep-out circle w0.254: c-2.89,1.305 r0.35
  Multi-Layer keep-out circle w0.254: c2.89,1.305 r0.35
  silkscreen extent -4.5,-4.97 4.57,0.6

## Part data
BT1: "Multicell Battery", LatestRevisionDate=17-Jul-2002, LatestRevisionNote="Re-released for DXP Platform.", PackageDescription="Battery; 2 Leads", PackageReference=BAT-2, Published=24-Mar-1999, Publisher="Altium Limited"
C1 C2 C3 C4 C5 C6 C7 C8 C9 C10 C11 C12 C13 C14 C15 C16 C17 C18 C19 C20 C21 C22 C23 C24 C25 C26 C27 C28 C29 C30 C31 C32 C33 C34 C35 C36 C37 C38 C39 C40: library part Cap, "Capacitor", LatestRevisionDate=17-Jul-2002, LatestRevisionNote="Re-released for DXP Platform.", PackageDescription="Radial Cap, Thru-Hole; 2 Leads; 0.3 in Pin Spacing", PackageReference=RAD-0.3, Published=8-Jun-2000, Publisher="Altium Limited"
D1: library part "Diode 1N4148", "High Conductance Fast Diode", Code_JEDEC=DO-204-AH, ComponentLink1Description="Manufacturer Link", ComponentLink1URL=http://www.fairchildsemi.com/, ComponentLink2Description=Datasheet, ComponentLink2URL=http://www.fairchildsemi.com/ds/1N%2F1N4148.pdf, DatasheetVersion=1997, LatestRevisionDate=17-Jul-2002, LatestRevisionNote="Re-released for DXP Platform.", PackageDescription="Diode, Axial; Body 3.8 x 1.9 mm (LxDia. max), Lead Dia. 0.53 mm (max)", PackageReference=DO-35, Published=8-Jun-2000, Publisher="Altium Limited"
D2 D3 D4: "Typical INFRARED GaAs LED", LatestRevisionDate=08-Jul-2005, LatestRevisionNote="Mech Layer 1 removed.", PackageDescription="LED; 2 Leads", PackageReference=LED-0, Published=8-Jun-2000, Publisher="Altium Limited"
F1: "耐压(Vmax):30V;最大电流(Imax):40A;保持电流(Ihold):1A;跳闸电流(Itrip):1.8A;", Current - Max=40A, Hold Current=1A, JLCPCB Part Class="Extended Part", LCSC Part Name="30V 1A", Manufacturer=R+O(宏嘉诚), ManufacturerPart=SMD1206-100-30, Operating Temperature=-40℃~+85℃, Power Dissipation=1W, Resistance - Initial (Ri) (Min)=50mΩ, Resistance - Post Trip (R1) (Max)=300mΩ, Trip Current=1.8A, Voltage - Max=30V, AddInBom=yes, ConvertToPcb=yes, Datasheet=https://item.szlcsc.com/datasheet/SMD1206-100-30/48798732.html, FootprintName=F1206, Height=1.3mm, Length=3.6mm, ModelId=f1628daad26847a79b887277a2bc8541, ModelName=F1206_L3.2-W1.7-H0.6, ModelTransform=125.984,66.929,0,0,0,0,0,0,0, Supplier=LCSC, Supplier Footprint=1206, SupplierPart=C46641026, Symbol=SMD1206-100-30, Time to Trip(Max)=300ms, Width=1.9mm
P1: "Header, 3-Pin", LatestRevisionDate=17-Jul-2002, LatestRevisionNote="Re-released for DXP Platform.", Publisher="Altium Limited"
P2: "Header, 4-Pin", LatestRevisionDate=17-Jul-2002, LatestRevisionNote="Re-released for DXP Platform.", Publisher="Altium Limited"
P5: "Header, 3-Pin, Dual row", LatestRevisionDate=17-Jul-2002, LatestRevisionNote="Re-released for DXP Platform.", Publisher="Altium Limited"
P6: "Header, 2-Pin, Dual row", LatestRevisionDate=17-Jul-2002, LatestRevisionNote="Re-released for DXP Platform.", Publisher="Altium Limited"
Q1: library part NPN, "NPN Bipolar Transistor", Code_JEDEC=TO-226-AA, LatestRevisionDate=17-Jul-2002, LatestRevisionNote="Re-released for DXP Platform.", PackageDescription="TO, Flat Index; 3 In-Line, Axial Leads; Body Dia. 4.8mm; Leads 0.55 x 0.51 mm (max)", PackageReference=TO-226-AA, Published=8-Jun-2000, Publisher="Altium Limited"
Q2: library part PNP, "PNP Bipolar Transistor", LatestRevisionDate=29-May-2009, LatestRevisionNote="IPC-7351 Footprint Added.", PackageDescription="3-Pin SOT-23 Package 0.95 mm Pitch, 2.4 mm Lead Span", PackageReference=SOT-23B, PackageVersion=Aug-1999, Published=8-Jun-2000, Publisher="Altium Limited"
R1 R2 R3 R4 R5 R6 R7 R8 R9 R10 R11 R12 R13 R14 R15 R16 R17 R18 R19 R20 R21 R22 R23 R24 R25: library part Res1, "Resistor", LatestRevisionDate=17-Jul-2002, LatestRevisionNote="Re-released for DXP Platform.", PackageDescription="Axial Device, Thru-Hole; 2 Leads; 0.3 in Pin Spacing", PackageReference=AXIAL-0.3, Published=8-Jun-2000, Publisher="Altium Limited"
S1 S2 S3: "Switch", LatestRevisionDate=17-Jul-2002, LatestRevisionNote="Re-released for DXP Platform.", PackageDescription="Switch; 2 Leads", PackageReference=SPST-2, Published=24-Mar-1999, Publisher="Altium Limited"
U1: "mcu"
U3: "二极管配置:1对共阴极;正向压降(Vf):1V@100mA;直流反向耐压(Vr):30V;整流电流:200mA;", Current - Rectified=200mA, JLCPCB Part Class="Extended Part", LCSC Part Name="电压:30V 电流:0.2A", Manufacturer=R+O(宏嘉诚), ManufacturerPart=BAT54C, Non-Repetitive Peak Forward Surge Current=600mA, Operating Junction Temperature Range=-, Reverse Leakage Current (Ir)=2uA@25V, Voltage - DC Reverse(Vr)=30V, Voltage - Forward(Vf@If)=1V@100mA, AddInBom=yes, ConvertToPcb=yes, Datasheet=https://item.szlcsc.com/datasheet/BAT54C/24165509.html, Diode Configuration=1对共阴极, FootprintName=SOT-23-3_L2.9-W1.3-P1.90-LS2.8-BR, ModelId=4be4999f02b344ffbcd0d3b39a4b0072, ModelName=SOT-23-3_L2.9-W1.3-P1.90-LS2.8-BR, ModelTransform=110.236,114.173,0,0,0,0,0,0,0, Supplier=LCSC, Supplier Footprint=SOT-23, SupplierPart=C22466350, Symbol=BAT54C_C22466350
U4: "存储容量:4Mbit;工作电压:3.3V~3.63V;", JLCPCB Part Class="Extended Part", LCSC Part Name="IS61LV25616AL 10TLI TR", Manufacturer=ISSI(北京矽成), ManufacturerPart=IS61LV25616AL-10TLI-TR, Operating Temperature=-40℃~+85℃, Standby Current (Iq)=20mA, Supply Current (Icc)=110mA, Voltage - Supply=3.3V~3.63V, Access Time=10ns, AddInBom=yes, ConvertToPcb=yes, Datasheet=https://item.szlcsc.com/datasheet/IS61LV25616AL-10TLI-TR/2154619.html, Features=自动掉电功能, FootprintName=TSOP-44_L18.4-W10.2-P0.80-LS11.8-BL, Interface=并口(Parallel), Memory Size=4Mbit, ModelId=560eb33016ce4e308706c564a2ec9c3c, ModelName=TSOP-44_L18.4-W10.2-H1.0-LS11.8-P0.80, ModelTransform=465.06033,724.408,0,90,0,0,0,-0.0005,0, Supplier=LCSC, Supplier Footprint=TSOPII-44-10.2mm, SupplierPart=C2063046, SymbolName=IS61LV25616AL-10TLI-TR
U6: "EEPROM"
Y1 Y2: library part XTAL, "Crystal Oscillator", LatestRevisionDate=17-Jul-2002, LatestRevisionNote="Re-released for DXP Platform.", PackageDescription="Crystal, Thru-Hole; 2 Leads; Body 3.1 x 8.2 mm (Dia.xH)", PackageReference=R38, Published=8-Jun-2000, Publisher="Altium Limited"

## Free pads (board coordinates)
  round 125.98 hole 122.05 mask+0.55: 0(130,130) 0(130,2625) 0(3960,2625) 0(3965,130)

## Nets (pads, with @x,y where several pads share a name; then routed paths per layer and width w, separated by ;. In a path a pad name is that pad's centre, name@x,y a point inside that pad or via, vN(x,y) a via of type N, cw(c..) or ccw(c..) an arc to the next point about the centre after c; other vN are vias at no path point)
3V3: C9.1 C10.1 C11.1 C12.1 C13.1 C17.1 C18.1 C19.1 C20.1 C21.1 C22.1 C23.1 C26.1 C27.1 C28.1 C29.1 C30.1 C34.2 C35.2 C36.1 C37.2 C40.1 P2.1 P3.38 P3.39 P3.40 P4.20 R5.1 R7.2 R12.2 R13.2 R15.2 R16.2 R17.2 R18.2 R19.2 U1.15 U1.23 U1.36 U1.49 U1.62 U1.72 U1.82 U1.91 U1.103 U1.114 U1.127 U1.136 U1.149 U1.159 U1.172 U2.2 U5.3 U6.8 U8.4
3V3_MCU: C33.1 D2.1 D3.1 D4.1 P1.1 P5.1 P5.2 P8.2 Q2.3 R1.2 R9.1 R10.1 R11.2 R14.2 S2.1 U3.1 U5.7 U5.8 | length 3.4
  Top Layer w10: P8.2 P8.2@3721.22,2538.78 ; 3721.22,2402.79 3722.44,2401.57
3V3MCU: S3.1
5V_USB: *1.2 *1.11 *2.2 *2.11 C38.2 F1.1 P5.5 P5.6 P8.69 U7.16
A5: P7.28 U1.21 U4.18
A6: U1.60 U4.19
A7: P8.53 U1.63 U4.20
A8: P8.54 U1.64 U4.21
A9: P8.51 U1.65 U4.22
BOOT0: R2.2 R22.1 S3.2 U1.166
BOOT1: R3.2 U1.58
CH340_RXD: P6.2 P8.34 U1.120
CH340_TXD: P6.4 P8.35 U1.121
DCAI_VSYNC: P4.14 P7.52 U1.165
DCAM_PCLK: P4.3 P7.6 U1.52
DCMI_BL: P4.18
DCMI_D0: P4.7 P8.29 U1.115
DCMI_D1: P4.5 P8.30 U1.116
DCMI_D2: P4.4 P8.31 R16.1 U1.117 U8.7
DCMI_D3: P4.6 P8.32 R15.1 U1.118 U8.8
DCMI_D4: P4.8 P7.42 U1.3
DCMI_D5: P4.9 P7.50 U1.163 U5.5
DCMI_D6: P4.10 P7.39 U1.4
DCMI_D7: P4.11 P7.40 U1.5
DCMI_HREF: P4.12 P7.8 U1.50
DCMI_PWDN: P4.13 U1.32
DCMI_RESET: P4.15 P7.21 U1.28
DCMI_SCL: P4.16 P7.53 U1.167
DCMI_SDA: P4.17 P7.54 R12.1 U1.168 U6.6
DCMI_XCLK: P4.2 P8.33 U1.119
FSMC_A0: P3.10 P7.31 U1.16 U4.1
FSMC_A1: P7.32 U1.17 U4.2
FSMC_A2: P7.29 U1.18 U4.3
FSMC_A3: P7.30 U1.19 U4.4
FSMC_A4: P7.27 U1.20 U4.5
FSMC_A10: P8.52 U1.66 U4.23
FSMC_A11: P8.49 U1.67 U4.24
FSMC_A12: P8.22 U1.106 U4.25
FSMC_A13: P8.23 U1.107 U4.26
FSMC_A14: P8.24 U1.108 U4.27
FSMC_A15: P8.25 U1.109 U4.42
FSMC_A16: P8.17 U1.99 U4.43
FSMC_A17: P8.18 U1.100 U4.44
FSMC_A18: P8.19 U1.101 U4.28
FSMC_ANBL0: P7.55 U1.169
FSMC_ANBL1: P7.56 U1.170
FSMC_D0: P3.17 P8.20 U1.104 U4.7
FSMC_D1: P3.18 P8.21 U1.105 U4.8
FSMC_D2: P3.19 P8.59 U1.142 U4.9
FSMC_D3: P3.20 P8.62 U1.143 U4.10
FSMC_D4: P3.21 P8.50 U1.68 U4.13
FSMC_D5: P3.22 P8.47 U1.69 U4.14
FSMC_D6: P3.23 P8.48 U1.70 U4.15
FSMC_D7: P3.24 P8.45 U1.73 U4.16
FSMC_D8: P3.25 P8.46 U1.74 U4.29
FSMC_D9: P3.26 P8.44 U1.75 U4.30
FSMC_D10: P3.27 P8.43 U1.76 U4.31
FSMC_D11: P3.28 P8.42 U1.77 U4.32
FSMC_D12: P3.29 P8.41 U1.78 U4.35
FSMC_D13: P3.30 P8.10 U1.96 U4.36
FSMC_D14: P3.31 P8.15 U1.97 U4.37
FSMC_D15: P3.32 P8.16 U1.98 U4.38
FSMC_NBL0: U4.39
FSMC_NBL1: U4.40
FSMC_NE3: P3.9 P7.64 U1.153
FSMC_NE4: R9.2 U4.6
FSMC_NEW: P3.11 P7.60 U1.147 U4.17
FSMC_NOR: P3.12 P7.59 U1.146 U4.41
GND: *1.1 *1.12 *1.13 *1.14 *2.1 *2.12 BT1.2 C1.2 C2.2 C3.2 C4.2 C5.1 C6.2 C7.2 C8.1 C9.2 C10.2 C11.2 C12.2 C13.2 C14.1 C15.1 C16.1 C17.2 C18.2 C19.2 C20.2 C21.2 C22.2 C23.2 C24.2 C25.2 C26.2 C27.2 C28.2 C29.2 C30.2 C31.1 C32.1 C33.2 C34.1 C35.1 C36.2 C37.1 C38.1 C39.1 C40.2 P2.4 P3.0 P3.14 P3.16 P3.34 P3.35 P3.36 P3.37 P4.19 P5.3 P5.4 P7.70 P8.1 P8.70 R2.1 R3.1 R4.1 R23.2 S1.2 U1.14 U1.22 U1.37 U1.48 U1.61 U1.71 U1.90 U1.102 U1.113 U1.126 U1.135 U1.148 U1.158 U2.1 U4.12 U4.34 U5.4 U6.1 U6.2 U6.3 U6.4 U6.7 U7.1 U8.6 U8.10 U8.11 U8.12 U8.13
IIC_SDA: P8.40 R13.1 U1.79 U6.5
LCD_BK: P3.33 P7.24 U1.27
LCD_RST: P3.15 P7.14 U1.59
NC/PDR_ON: R4.2 R5.2 U1.171
NetBT1_1: BT1.1 U3.2
NetC4_1: C4.1 U1.81
NetC5_2: C5.2 U1.125
NetC24_1: C24.1 C25.1 F1.2 U2.3
NetC31_2: C31.2 R10.2 U4.11
NetC32_2: C32.2 R11.1 U4.33
NetC39_2: C39.2 U7.4
NetD1_2: D1.2 Q1.1 R14.1
NetD2_2: D2.2 R23.1
NetD3_2: D3.2 R24.1
NetD4_2: D4.2 R25.1
NetP1_2: P1.2 R6.1
NetP6_1: P6.1 U7.3
NetP6_3: P6.3 U7.2
NetQ1_2: Q1.2 R20.1
NetQ1_3: Q1.3 R21.2 U7.14
NetQ2_1: Q2.1 R22.2
NetQ2_2: Q2.2 R21.1
NetR20_2: R20.2 U7.13
NRESET: C1.1 D1.1 R1.1 S1.1 U1.31
OSC32_IN: C14.2 U1.9 Y2.1
OSC32_OUT: C16.2 U1.10 Y2.2
OSC_IN: C8.2 R8.1 U1.29 Y1.1
OSC_OUT: C15.2 R8.2 U1.30 Y1.2
PA0: P7.17 S2.2 U1.40
PA1: P7.18 U1.41
PA2: P7.15 U1.42
PA3: P7.7 U1.47
PA5: P7.5 U1.51
PA7: P7.3 U1.53
PA11: P8.36 U1.122
PA12: P8.37 U1.123
PA13: P2.2 P8.38 U1.124
PA14: P2.3 P8.56 U1.137
PA15: P8.55 U1.138
PB0: P7.12 U1.56
PB1: P7.11 U1.57
PB3: P7.48 U1.161 U5.6
PB4: P7.49 U1.162 U5.2
PB6: P7.51 U1.164
PB11: P8.39 U1.80
PB12: P8.11 U1.92
PB13: P8.12 U1.93
PB14: P8.13 U1.94
PB15: P8.14 U1.95
PC1: P7.22 U1.33
PC2: P7.19 U1.34
PC3: P7.20 U1.35
PC4: P7.4 R24.2 U1.54
PC5: P7.1 R25.2 U1.55
PC10: P8.58 R19.1 U1.139 U8.1
PC11: P8.57 R18.1 U1.140 U8.2
PC12: P8.60 U1.141 U8.5
PC13: P7.35 U1.8
PD2: P7.57 R17.1 U1.144 U8.3
PD3: P3.4 P7.58 U1.145
PD6: P3.3 P7.61 U1.150
PD7: P3.2 P7.62 U1.151
PE2: P7.44 U1.1
PE3: P7.41 U1.2
PF6: P7.25 U1.24
PF7: P7.26 U1.25
PF8: P7.23 U1.26
PG6: P8.26 U1.110 U5.1
PG7: P8.27 U1.111
PG8: P3.5 P8.28 U1.112
PG9: P3.1 P7.63 U1.152
PG11: P7.43 U1.154
PG12: P7.45 U1.155
PG13: P7.46 U1.156
PG14: P7.47 U1.157
PG15: P7.69 U1.160
PH2: P7.16 U1.43
PH3: P7.13 U1.44
PH4: P7.9 U1.45
PH5: P7.10 U1.46
PH6: P8.3 U1.83
PH7: P8.4 U1.84
PH8: P8.5 U1.85
PH9: P8.6 U1.86
PH10: P8.7 U1.87
PH11: P8.8 U1.88
PH12: P8.9 U1.89
PH13: P8.61 U1.128
PH14: P8.64 U1.129
PH15: P8.63 U1.130
PI0: P8.66 U1.131
PI1: P8.65 U1.132
PI2: P8.68 U1.133
PI3: P8.67 U1.134
PI4: P7.68 U1.173
PI5: P7.67 U1.174
PI6: P7.66 U1.175
PI7: P7.65 U1.176
PI8: P7.38 U1.7
PI9: P7.36 U1.11
PI10: P7.33 U1.12
PI11: P7.34 U1.13
USB1OTG_N: *1.5 *1.7
USB1OTG_P: *1.6 *1.8
USB340_N: *2.5 *2.7 U7.6
USB340_P: *2.6 *2.8 U7.5
VBAT: P7.37 U1.6 U3.3
VCC: P4.1
VDDA: C6.1 C7.1 R7.1 U1.39
VREF: P1.3 P7.2
VREF+: C2.1 C3.1 R6.2 U1.38
pads on no net: *1.3 *1.4 *1.9 *1.10 *2.3 *2.4 *2.9 *2.10 *2.13 *2.14 P2.5 P2.6 P3.6 P3.7 P3.8 P3.13 P4.21 P4.22 U7.7 U7.8 U7.9 U7.10 U7.11 U7.12 U7.15 U8.CD

## Polygon pours and split planes (outlines as drawn)
VCC on VCC (split plane): 4074.39,20.1 20.1,20.1 20.1,2735.81 4074.39,2735.81
GND on GND (split plane): 4074.39,20.1 20.1,20.1 20.1,2735.81 4074.39,2735.81

## Keep-outs
Keep-Out Layer:
  the board outline again, w10

## Silkscreen, mask and mechanical layers (free items; w line width, h text height)
Top Overlay:
  circle w10: c3965,130 r70.52
  circle w10: c3965,130 r98.49
  circle w10: c3960,2625 r70.52
  circle w10: c3960,2625 r98.49
  circle w10: c130,2625 r70.52
  circle w10: c130,2625 r98.49
  circle w10: c130,130 r98.49
  circle w10: c130,130 r70.52
  lines w23.62: 50.06,100.9 cw(c130,130) 50.06,159.1 ; 50.06,2595.9 cw(c130,2625) 50.06,2654.1 ; 100.9,50.06 ccw(c130,130) 159.1,50.06 ; 100.9,209.94 cw(c130,130) 159.1,209.94 ; 100.9,2545.06 ccw(c130,2625) 159.1,2545.06 ; 100.9,2704.94 cw(c130,2625) 159.1,2704.94 ; 209.94,100.9 ccw(c130,130) 209.94,159.1 ; 209.94,2595.9 ccw(c130,2625) 209.94,2654.1 ; 3880.06,2595.9 cw(c3960,2625) 3880.06,2654.1 ; 3885.06,100.9 cw(c3965,130) 3885.06,159.1 ; 3930.9,2545.06 ccw(c3960,2625) 3989.1,2545.06 ; 3930.9,2704.94 cw(c3960,2625) 3989.1,2704.94 ; 3935.9,50.06 ccw(c3965,130) 3994.1,50.06 ; 3935.9,209.94 cw(c3965,130) 3994.1,209.94 ; 4039.94,2595.9 ccw(c3960,2625) 4039.94,2654.1 ; 4044.94,100.9 ccw(c3965,130) 4044.94,159.1

## Text inside footprints (layer, text, board x,y; h text height)
P5: Top Overlay "6" at 8695,1010 h50 r90; Top Overlay "5" at 8795,1010 h50 r90; Top Overlay "2" at 8695,650 h50 r90; Top Overlay "1" at 8795,670 h50 r90
P6: Top Overlay "1" at 5240,770 h50 r90; Top Overlay "2" at 5140,750 h50 r90; Top Overlay "4" at 5140,1010 h50 r90; Top Overlay "3" at 5240,1010 h50 r90